# Altium PCB Membrane_Board.PcbDoc (part 1 of 5)
Units mm, origin at the board's own origin, x right, y up, seen from the top; angles counter-clockwise.
Board outline 303 x 126.06 mm, 2 copper layers (Top Layer, Bottom Layer), stack 1.499 mm thick; 248 components, 169 nets, 1258 pads, 728 vias.
Unrouted connection lines stored in the file: 317.
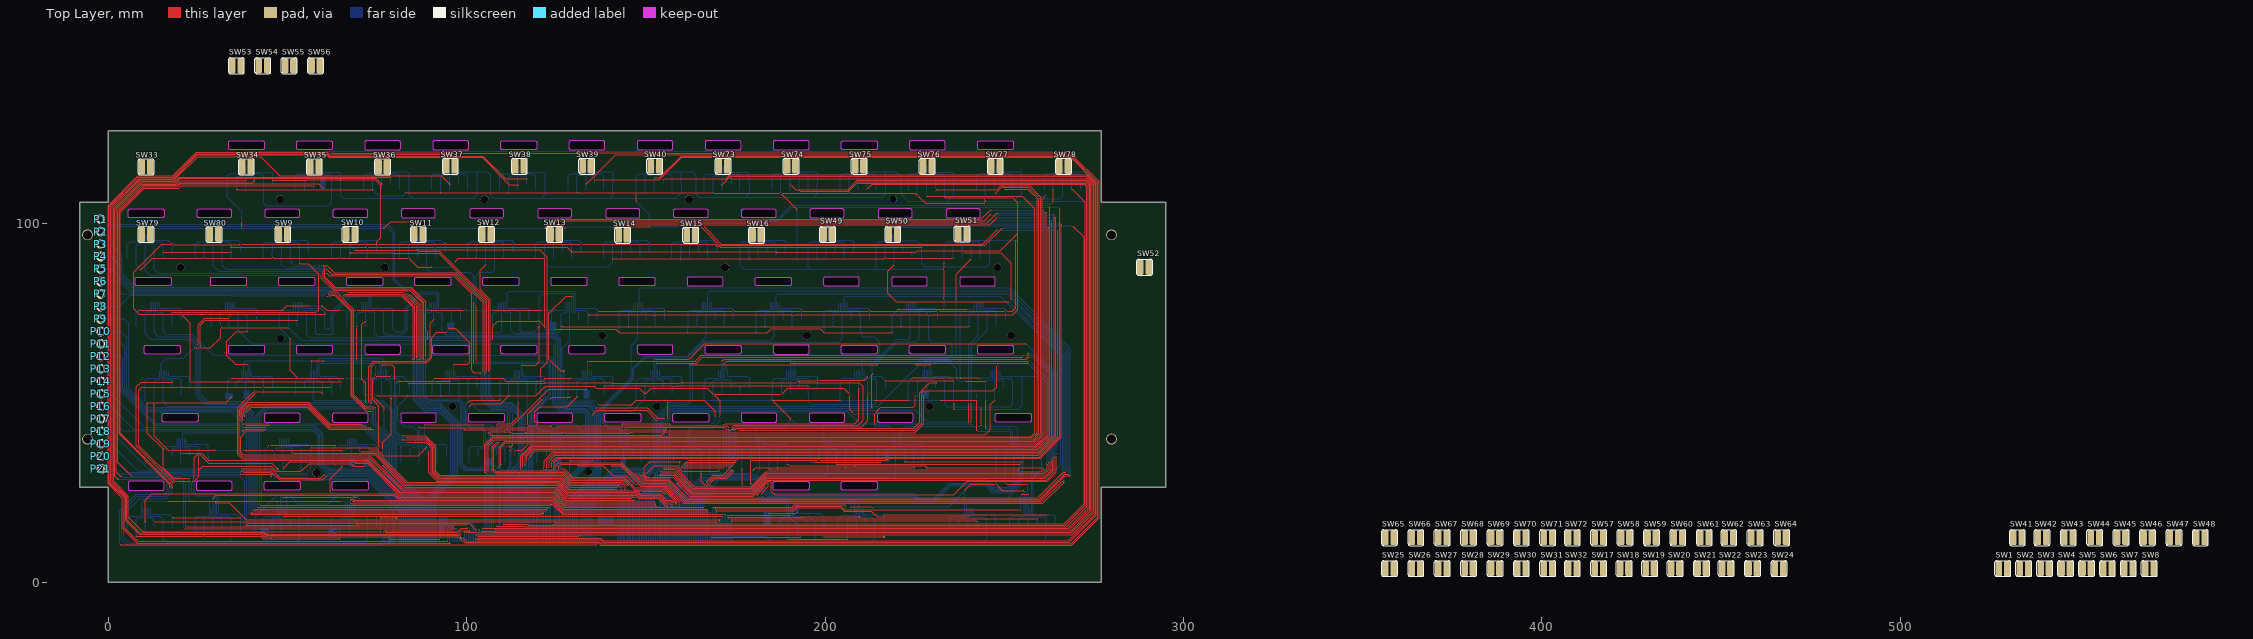
[diagram p0: Top Layer view]
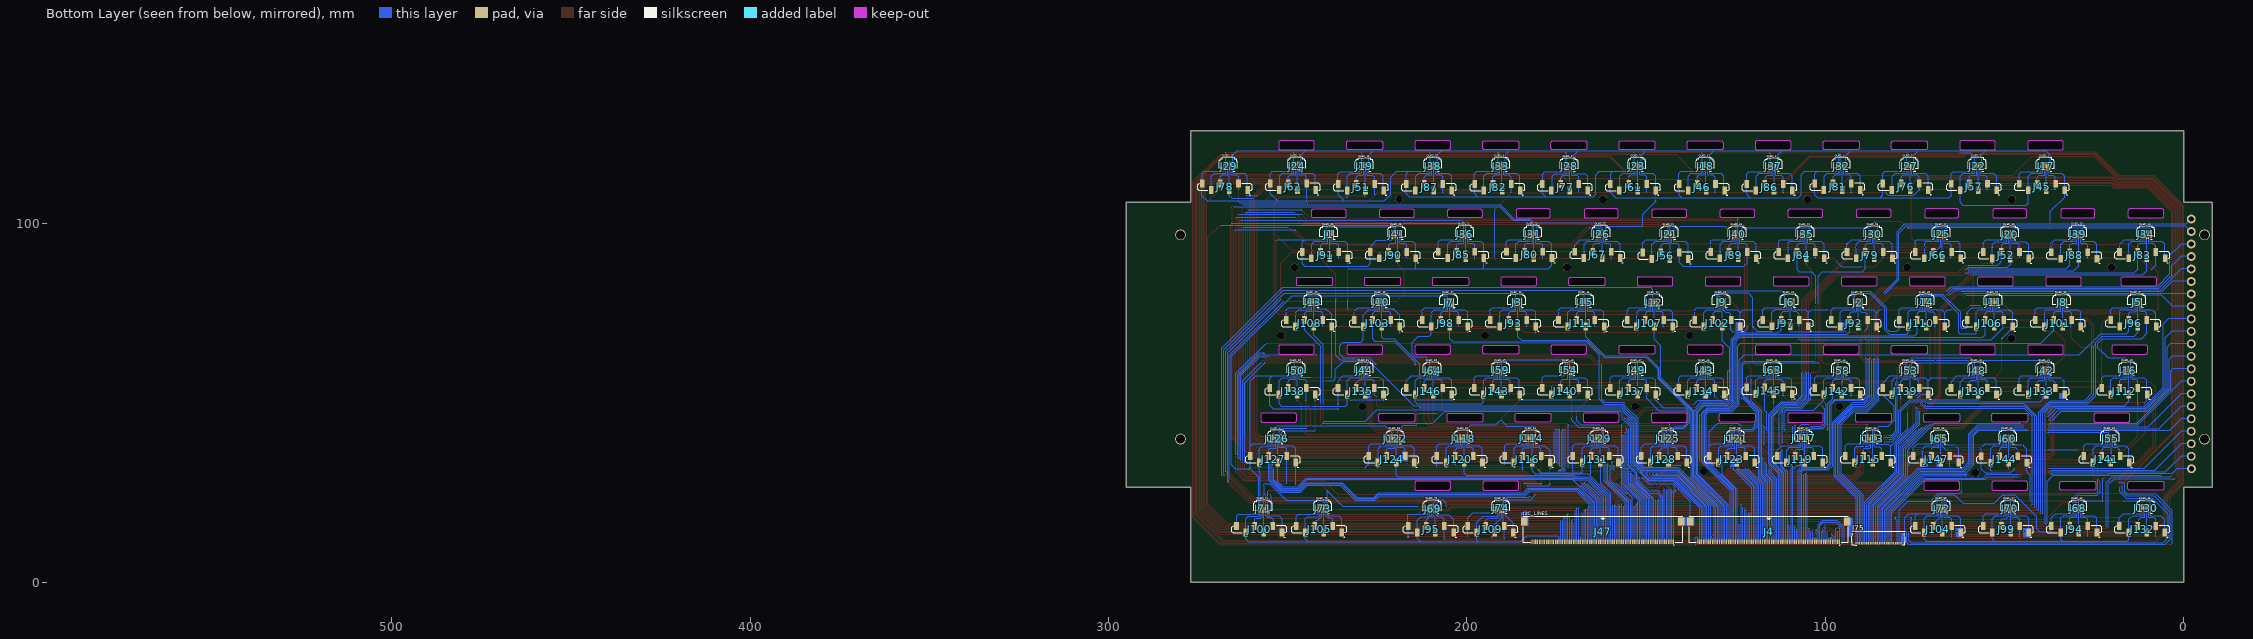
[diagram p1: Bottom Layer view, seen from below]

## Layer stack, top to bottom
Top Solder: solder mask 0.0508, Solder Resist, Dk 3.5
Top Layer: signal copper 0.3048
Dielectric 1: dielectric 0.889, FR-4, Dk 4.8
Bottom Layer: signal copper 0.3048
Bottom Solder: solder mask 0.0508, Solder Resist, Dk 3.5

## Board outline
0,0 0,26.495 -8,26.495 -8,106.055 0,106.055 0,126.055 277,126.055 277,106.055 295,106.055 295,26.495 277,26.495 277,0
cut-out: 6,101.68 cw(c6,102.18) 5.5,102.18 5.5,103.68 cw(c6,103.68) 6,104.18 15,104.18 cw(c15,103.68) 15.5,103.68 15.5,102.18 cw(c15,102.18) 15,101.68
cut-out: 24.75,102.18 24.75,103.68 cw(c25.25,103.68) 25.25,104.18 33.75,104.18 cw(c33.75,103.68) 34.25,103.68 34.25,102.18 cw(c33.75,102.18) 33.75,101.68 25.25,101.68 cw(c25.25,102.18)
cut-out: 7.5,83.18 7.5,84.68 cw(c8,84.68) 8,85.18 17,85.18 cw(c17,84.68) 17.5,84.68 17.5,83.18 cw(c17,83.18) 17,82.68 8,82.68 cw(c8,83.18)
cut-out: 28.5,83.18 28.5,84.68 cw(c29,84.68) 29,85.18 38,85.18 cw(c38,84.68) 38.5,84.68 38.5,83.18 cw(c38,83.18) 38,82.68 29,82.68 cw(c29,83.18)
cut-out: 33.5,64.18 33.5,65.68 cw(c34,65.68) 34,66.18 43,66.18 cw(c43,65.68) 43.5,65.68 43.5,64.18 cw(c43,64.18) 43,63.68 34,63.68 cw(c34,64.18)
cut-out: 10,64.18 10,65.68 cw(c10.5,65.68) 10.5,66.18 19.5,66.18 cw(c19.5,65.68) 20,65.68 20,64.18 cw(c19.5,64.18) 19.5,63.68 10.5,63.68 cw(c10.5,64.18)
cut-out: 15,45.18 15,46.68 cw(c15.5,46.68) 15.5,47.18 24.5,47.18 cw(c24.5,46.68) 25,46.68 25,45.18 cw(c24.5,45.18) 24.5,44.68 15.5,44.68 cw(c15.5,45.18)
cut-out: 5.5,26.18 ccw(c6,26.18) 6,25.68 15,25.68 ccw(c15,26.18) 15.5,26.18 15.5,27.68 ccw(c15,27.68) 15,28.18 6,28.18 ccw(c6,27.68) 5.5,27.68
cut-out: 24.5,26.18 ccw(c25,26.18) 25,25.68 34,25.68 ccw(c34,26.18) 34.5,26.18 34.5,27.68 ccw(c34,27.68) 34,28.18 25,28.18 ccw(c25,27.68) 24.5,27.68
cut-out: 43.5,26.18 43.5,27.68 cw(c44,27.68) 44,28.18 53,28.18 cw(c53,27.68) 53.5,27.68 53.5,26.18 cw(c53,26.18) 53,25.68 44,25.68 cw(c44,26.18)
cut-out: 62.5,26.18 62.5,27.68 cw(c63,27.68) 63,28.18 72,28.18 cw(c72,27.68) 72.5,27.68 72.5,26.18 cw(c72,26.18) 72,25.68 63,25.68 cw(c63,26.18)
cut-out: 100.75,102.18 ccw(c101.25,102.18) 101.25,101.68 109.75,101.68 ccw(c109.75,102.18) 110.25,102.18 110.25,103.68 ccw(c109.75,103.68) 109.75,104.18 101.25,104.18 ccw(c101.25,103.68) 100.75,103.68
cut-out: 81.75,102.18 ccw(c82.25,102.18) 82.25,101.68 90.75,101.68 ccw(c90.75,102.18) 91.25,102.18 91.25,103.68 ccw(c90.75,103.68) 90.75,104.18 82.25,104.18 ccw(c82.25,103.68) 81.75,103.68
cut-out: 62.75,102.18 62.75,103.68 cw(c63.25,103.68) 63.25,104.18 71.75,104.18 cw(c71.75,103.68) 72.25,103.68 72.25,102.18 cw(c71.75,102.18) 71.75,101.68 63.25,101.68 cw(c63.25,102.18)
cut-out: 43.75,102.18 43.75,103.68 cw(c44.25,103.68) 44.25,104.18 52.75,104.18 cw(c52.75,103.68) 53.25,103.68 53.25,102.18 cw(c52.75,102.18) 52.75,101.68 44.25,101.68 cw(c44.25,102.18)
cut-out: 47.5,83.18 47.5,84.68 cw(c48,84.68) 48,85.18 57,85.18 cw(c57,84.68) 57.5,84.68 57.5,83.18 cw(c57,83.18) 57,82.68 48,82.68 cw(c48,83.18)
cut-out: 66.5,83.18 66.5,84.68 cw(c67,84.68) 67,85.18 76,85.18 cw(c76,84.68) 76.5,84.68 76.5,83.18 cw(c76,83.18) 76,82.68 67,82.68 cw(c67,83.18)
cut-out: 52.5,64.18 52.5,65.68 cw(c53,65.68) 53,66.18 62,66.18 cw(c62,65.68) 62.5,65.68 62.5,64.18 cw(c62,64.18) 62,63.68 53,63.68 cw(c53,64.18)
cut-out: 43.5,45.18 ccw(c44,45.18) 44,44.68 53,44.68 ccw(c53,45.18) 53.5,45.18 53.5,46.68 ccw(c53,46.68) 53,47.18 44,47.18 ccw(c44,46.68) 43.5,46.68
cut-out: 62.5,45.18 ccw(c63,45.18) 63,44.68 72,44.68 ccw(c72,45.18) 72.5,45.18 72.5,46.68 ccw(c72,46.68) 72,47.18 63,47.18 ccw(c63,46.68) 62.5,46.68
cut-out: 71.5,64.18 ccw(c72,64.18) 72,63.68 81,63.68 ccw(c81,64.18) 81.5,64.18 81.5,65.68 ccw(c81,65.68) 81,66.18 72,66.18 ccw(c72,65.68) 71.5,65.68
cut-out: 81.5,45.18 ccw(c82,45.18) 82,44.68 91,44.68 ccw(c91,45.18) 91.5,45.18 91.5,46.68 ccw(c91,46.68) 91,47.18 82,47.18 ccw(c82,46.68) 81.5,46.68
cut-out: 100.5,45.18 100.5,46.68 cw(c101,46.68) 101,47.18 110,47.18 cw(c110,46.68) 110.5,46.68 110.5,45.18 cw(c110,45.18) 110,44.68 101,44.68 cw(c101,45.18)
cut-out: 90.5,64.18 90.5,65.68 cw(c91,65.68) 91,66.18 100,66.18 cw(c100,65.68) 100.5,65.68 100.5,64.18 cw(c100,64.18) 100,63.68 91,63.68 cw(c91,64.18)
cut-out: 85.5,83.18 85.5,84.68 cw(c86,84.68) 86,85.18 95,85.18 cw(c95,84.68) 95.5,84.68 95.5,83.18 cw(c95,83.18) 95,82.68 86,82.68 cw(c86,83.18)
cut-out: 104.5,83.18 104.5,84.68 cw(c105,84.68) 105,85.18 114,85.18 cw(c114,84.68) 114.5,84.68 114.5,83.18 cw(c114,83.18) 114,82.68 105,82.68 cw(c105,83.18)
cut-out: 109.5,64.18 109.5,65.68 cw(c110,65.68) 110,66.18 119,66.18 cw(c119,65.68) 119.5,65.68 119.5,64.18 cw(c119,64.18) 119,63.68 110,63.68 cw(c110,64.18)
cut-out: 119.75,102.18 ccw(c120.25,102.18) 120.25,101.68 128.75,101.68 ccw(c128.75,102.18) 129.25,102.18 129.25,103.68 ccw(c128.75,103.68) 128.75,104.18 120.25,104.18 ccw(c120.25,103.68) 119.75,103.68
cut-out: 138.75,102.18 ccw(c139.25,102.18) 139.25,101.68 147.75,101.68 ccw(c147.75,102.18) 148.25,102.18 148.25,103.68 ccw(c147.75,103.68) 147.75,104.18 139.25,104.18 ccw(c139.25,103.68) 138.75,103.68
cut-out: 123.5,83.18 123.5,84.68 cw(c124,84.68) 124,85.18 133,85.18 cw(c133,84.68) 133.5,84.68 133.5,83.18 cw(c133,83.18) 133,82.68 124,82.68 cw(c124,83.18)
cut-out: 142.5,83.18 142.5,84.68 cw(c143,84.68) 143,85.18 152,85.18 cw(c152,84.68) 152.5,84.68 152.5,83.18 cw(c152,83.18) 152,82.68 143,82.68 cw(c143,83.18)
cut-out: 128.5,64.18 128.5,65.68 cw(c129,65.68) 129,66.18 138,66.18 cw(c138,65.68) 138.5,65.68 138.5,64.18 cw(c138,64.18) 138,63.68 129,63.68 cw(c129,64.18)
cut-out: 147.5,64.18 ccw(c148,64.18) 148,63.68 157,63.68 ccw(c157,64.18) 157.5,64.18 157.5,65.68 ccw(c157,65.68) 157,66.18 148,66.18 ccw(c148,65.68) 147.5,65.68
cut-out: 119.5,45.18 ccw(c120,45.18) 120,44.68 129,44.68 ccw(c129,45.18) 129.5,45.18 129.5,46.68 ccw(c129,46.68) 129,47.18 120,47.18 ccw(c120,46.68) 119.5,46.68
cut-out: 138.5,45.18 138.5,46.68 cw(c139,46.68) 139,47.18 148,47.18 cw(c148,46.68) 148.5,46.68 148.5,45.18 cw(c148,45.18) 148,44.68 139,44.68 cw(c139,45.18)
cut-out: 157.5,45.18 157.5,46.68 cw(c158,46.68) 158,47.18 167,47.18 cw(c167,46.68) 167.5,46.68 167.5,45.18 cw(c167,45.18) 167,44.68 158,44.68 cw(c158,45.18)
cut-out: 157.75,102.18 157.75,103.68 cw(c158.25,103.68) 158.25,104.18 166.75,104.18 cw(c166.75,103.68) 167.25,103.68 167.25,102.18 cw(c166.75,102.18) 166.75,101.68 158.25,101.68 cw(c158.25,102.18)
cut-out: 176.75,102.18 176.75,103.68 cw(c177.25,103.68) 177.25,104.18 185.75,104.18 cw(c185.75,103.68) 186.25,103.68 186.25,102.18 cw(c185.75,102.18) 185.75,101.68 177.25,101.68 cw(c177.25,102.18)
cut-out: 180.5,83.18 180.5,84.68 cw(c181,84.68) 181,85.18 190,85.18 cw(c190,84.68) 190.5,84.68 190.5,83.18 cw(c190,83.18) 190,82.68 181,82.68 cw(c181,83.18)
cut-out: 161.5,83.18 ccw(c162,83.18) 162,82.68 171,82.68 ccw(c171,83.18) 171.5,83.18 171.5,84.68 ccw(c171,84.68) 171,85.18 162,85.18 ccw(c162,84.68) 161.5,84.68
cut-out: 166.5,64.18 166.5,65.68 cw(c167,65.68) 167,66.18 176,66.18 cw(c176,65.68) 176.5,65.68 176.5,64.18 cw(c176,64.18) 176,63.68 167,63.68 cw(c167,64.18)
cut-out: 185.5,64.18 ccw(c186,64.18) 186,63.68 195,63.68 ccw(c195,64.18) 195.5,64.18 195.5,65.68 ccw(c195,65.68) 195,66.18 186,66.18 ccw(c186,65.68) 185.5,65.68
cut-out: 204.5,64.18 204.5,65.68 cw(c205,65.68) 205,66.18 214,66.18 cw(c214,65.68) 214.5,65.68 214.5,64.18 cw(c214,64.18) 214,63.68 205,63.68 cw(c205,64.18)
cut-out: 199.5,83.18 ccw(c200,83.18) 200,82.68 209,82.68 ccw(c209,83.18) 209.5,83.18 209.5,84.68 ccw(c209,84.68) 209,85.18 200,85.18 ccw(c200,84.68) 199.5,84.68
cut-out: 195.75,102.18 ccw(c196.25,102.18) 196.25,101.68 204.75,101.68 ccw(c204.75,102.18) 205.25,102.18 205.25,103.68 ccw(c204.75,103.68) 204.75,104.18 196.25,104.18 ccw(c196.25,103.68) 195.75,103.68
cut-out: 176.5,45.18 ccw(c177,45.18) 177,44.68 186,44.68 ccw(c186,45.18) 186.5,45.18 186.5,46.68 ccw(c186,46.68) 186,47.18 177,47.18 ccw(c177,46.68) 176.5,46.68
cut-out: 195.5,45.18 ccw(c196,45.18) 196,44.68 205,44.68 ccw(c205,45.18) 205.5,45.18 205.5,46.68 ccw(c205,46.68) 205,47.18 196,47.18 ccw(c196,46.68) 195.5,46.68
cut-out: 185.5,26.18 185.5,27.68 cw(c186,27.68) 186,28.18 195,28.18 cw(c195,27.68) 195.5,27.68 195.5,26.18 cw(c195,26.18) 195,25.68 186,25.68 cw(c186,26.18)
cut-out: 204.5,26.18 204.5,27.68 cw(c205,27.68) 205,28.18 214,28.18 cw(c214,27.68) 214.5,27.68 214.5,26.18 cw(c214,26.18) 214,25.68 205,25.68 cw(c205,26.18)
cut-out: 214.5,45.18 ccw(c215,45.18) 215,44.68 224,44.68 ccw(c224,45.18) 224.5,45.18 224.5,46.68 ccw(c224,46.68) 224,47.18 215,47.18 ccw(c215,46.68) 214.5,46.68
cut-out: 247.5,45.18 247.5,46.68 cw(c248,46.68) 248,47.18 257,47.18 cw(c257,46.68) 257.5,46.68 257.5,45.18 cw(c257,45.18) 257,44.68 248,44.68 cw(c248,45.18)
cut-out: 223.5,64.18 223.5,65.68 cw(c224,65.68) 224,66.18 233,66.18 cw(c233,65.68) 233.5,65.68 233.5,64.18 cw(c233,64.18) 233,63.68 224,63.68 cw(c224,64.18)
cut-out: 242.5,64.18 242.5,65.68 cw(c243,65.68) 243,66.18 252,66.18 cw(c252,65.68) 252.5,65.68 252.5,64.18 cw(c252,64.18) 252,63.68 243,63.68 cw(c243,64.18)
cut-out: 218.5,83.18 ccw(c219,83.18) 219,82.68 228,82.68 ccw(c228,83.18) 228.5,83.18 228.5,84.68 ccw(c228,84.68) 228,85.18 219,85.18 ccw(c219,84.68) 218.5,84.68
cut-out: 214.75,102.18 ccw(c215.25,102.18) 215.25,101.68 223.75,101.68 ccw(c223.75,102.18) 224.25,102.18 224.25,103.68 ccw(c223.75,103.68) 223.75,104.18 215.25,104.18 ccw(c215.25,103.68) 214.75,103.68
cut-out: 237.5,83.18 ccw(c238,83.18) 238,82.68 247,82.68 ccw(c247,83.18) 247.5,83.18 247.5,84.68 ccw(c247,84.68) 247,85.18 238,85.18 ccw(c238,84.68) 237.5,84.68
cut-out: 233.75,102.18 ccw(c234.25,102.18) 234.25,101.68 242.75,101.68 ccw(c242.75,102.18) 243.25,102.18 243.25,103.68 ccw(c242.75,103.68) 242.75,104.18 234.25,104.18 ccw(c234.25,103.68) 233.75,103.68
cut-out: 242.5,121.18 242.5,122.68 cw(c243,122.68) 243,123.18 252,123.18 cw(c252,122.68) 252.5,122.68 252.5,121.18 cw(c252,121.18) 252,120.68 243,120.68 cw(c243,121.18)
cut-out: 223.5,121.18 ccw(c224,121.18) 224,120.68 233,120.68 ccw(c233,121.18) 233.5,121.18 233.5,122.68 ccw(c233,122.68) 233,123.18 224,123.18 ccw(c224,122.68) 223.5,122.68
cut-out: 204.5,121.18 204.5,122.68 cw(c205,122.68) 205,123.18 214,123.18 cw(c214,122.68) 214.5,122.68 214.5,121.18 cw(c214,121.18) 214,120.68 205,120.68 cw(c205,121.18)
cut-out: 185.5,121.18 ccw(c186,121.18) 186,120.68 195,120.68 ccw(c195,121.18) 195.5,121.18 195.5,122.68 ccw(c195,122.68) 195,123.18 186,123.18 ccw(c186,122.68) 185.5,122.68
cut-out: 166.5,121.18 ccw(c167,121.18) 167,120.68 176,120.68 ccw(c176,121.18) 176.5,121.18 176.5,122.68 ccw(c176,122.68) 176,123.18 167,123.18 ccw(c167,122.68) 166.5,122.68
cut-out: 148,120.68 157,120.68 ccw(c157,121.18) 157.5,121.18 157.5,122.68 ccw(c157,122.68) 157,123.18 148,123.18 ccw(c148,122.68) 147.5,122.68 147.5,121.18 ccw(c148,121.18)
cut-out: 148,120.68 157,120.68 ccw(c157,121.18) 157.5,121.18 157.5,122.68 ccw(c157,122.68) 157,123.18 148,123.18 ccw(c148,122.68) 147.5,122.68 147.5,121.18 ccw(c148,121.18)
cut-out: 129,120.68 138,120.68 ccw(c138,121.18) 138.5,121.18 138.5,122.68 ccw(c138,122.68) 138,123.18 129,123.18 ccw(c129,122.68) 128.5,122.68 128.5,121.18 ccw(c129,121.18)
cut-out: 109.5,121.18 109.5,122.68 cw(c110,122.68) 110,123.18 119,123.18 cw(c119,122.68) 119.5,122.68 119.5,121.18 cw(c119,121.18) 119,120.68 110,120.68 cw(c110,121.18)
cut-out: 91,120.68 100,120.68 ccw(c100,121.18) 100.5,121.18 100.5,122.68 ccw(c100,122.68) 100,123.18 91,123.18 ccw(c91,122.68) 90.5,122.68 90.5,121.18 ccw(c91,121.18)
cut-out: 72,120.68 81,120.68 ccw(c81,121.18) 81.5,121.18 81.5,122.68 ccw(c81,122.68) 81,123.18 72,123.18 ccw(c72,122.68) 71.5,122.68 71.5,121.18 ccw(c72,121.18)
cut-out: 52.5,121.18 52.5,122.68 cw(c53,122.68) 53,123.18 62,123.18 cw(c62,122.68) 62.5,122.68 62.5,121.18 cw(c62,121.18) 62,120.68 53,120.68 cw(c53,121.18)
cut-out: 34,120.68 cw(c34,121.18) 33.5,121.18 33.5,122.68 cw(c34,122.68) 34,123.18 43,123.18 cw(c43,122.68) 43.5,122.68 43.5,121.18 cw(c43,121.18) 43,120.68

## Design rules (kind name [scope] priority, off if disabled: settings)
Clearance [All] p1: gap=0.178 ignorepadtopadclearanceinfootprint=FALSE except(0.102: Arc-SMDPad Track-SMDPad SMDPad-SMDPad)
ComponentClearance [All] p1: gap=0 collisioncheckmode=3 verticalgap=0 showdistances=FALSE
HoleSize [All] p1: absolutevalues=TRUE maxlimit=25.4 minlimit=0.025 maxpercent=80.000 minpercent=20.000
HoleToHoleClearance [All] p1: gap=0 allowstackedmicrovias=TRUE
MinimumSolderMaskSliver [All] p1: minsoldermaskwidth=0
PolygonConnect [All] p1: connectstyle=Relief reliefconductorwidth=0.254 reliefentries=4 polygonreliefangle="90 Angle" airgapwidth=0.254
RoutingVias [All] p1: holewidth=0.3 width=0.6 viastyle="Through Hole" minholewidth=0.2 minwidth=0.4 maxholewidth=0.3 maxwidth=0.6
SilkToSilkClearance [All] p1: silktosilkclearance=0
SilkToSolderMaskClearance [IsPad] p1: minsilkscreentomaskgap=0 clearancetoexposedcopper=TRUE
SolderMaskExpansion [All] p1: expansion=0.102 istentingtop=FALSE
Width [All] p1: maxlimit=1.27 minlimit=0.203 preferedwidth=0.203 minimp=50.000000 maximp=50.000000 favimp=50.000000
24 further rules are at their usual default settings.

## Classes and differential pairs
component class U_Button_Sheet_2: SW41 SW42 SW43 SW44 SW45 SW46 SW47 SW48 SW49 SW50 SW51 SW52 SW53 SW54 SW55 SW56 SW57 SW58 SW59 SW60 SW61 SW62 SW63 SW64 SW65 SW66 SW67 SW68 SW69 SW70 SW71 SW72 SW73 SW74 SW75 SW76 SW77 SW78 SW79 SW80
component class U_Button_Sheet_1: SW1 SW2 SW3 SW4 SW5 SW6 SW7 SW8 SW9 SW10 SW11 SW12 SW13 SW14 SW15 SW16 SW17 SW18 SW19 SW20 SW21 SW22 SW23 SW24 SW25 SW26 SW27 SW28 SW29 SW30 SW31 SW32 SW33 SW34 SW35 SW36 SW37 SW38 SW39 SW40
component class U_Header_Sheet_4: J133 J134 J135 J136 J137 J138 J139 J140 J141 J142 J143 J144 J145 J146 J147
component class U_Header_Sheet_3: J113 J114 J115 J116 J117 J118 J119 J120 J121 J122 J123 J124 J125 J126 J127 J128 J129 J130 J131 J132 S
component class U_Header_Sheet_2: J91 J92 J93 J94 J95 J96 J97 J98 J99 J100 J101 J102 J103 J104 J105 J106 J107 J108 J109 J110 J111 J112
component class U_Header_Sheet_1: J45 J46 J51 J52 J56 J57 J61 J62 J66 J67 J76 J77 J78 J79 J80 J81 J82 J83 J84 J85 J86 J87 J88 J89 J90
component class U_Controller_Sheet_5: J75 P1 P2 P3 P4 P5 P6 P7 P8 P9 P10 P11 P12 P13 P14 P15 P16 P17 P18 P19 P20 P21
component class U_Connector_Sheet_4: J68 J69 J70 J71 J72 J73 J74
component class U_Connector_Sheet_3: J42 J43 J44 J47 J48 J49 J50 J53 J54 J55 J58 J59 J60 J63 J64 J65
component class U_Connector_Sheet_2: J17 J18 J19 J20 J21 J22 J23 J24 J25 J26 J27 J28 J29 J30 J31 J32 J33 J34 J35 J36 J37 J38 J39 J40 J41
component class U_Connector_Sheet_1: J1 J2 J3 J4 J5 J6 J7 J8 J9 J10 J11 J12 J13 J14 J15 J16

## Components (designator, comment, footprint, x,y, rotation, side; value= is the part's Value field where it differs from the comment)
J1 "FH19C-6S-0.5SH(10)" FH19C-6S-0.5SH(10) 237.28,97.072 r0 bottom locked
J2 "FH19C-6S-0.5SH(10)" FH19C-6S-0.5SH(10) 89.706,78.048 r0 bottom locked
J3 "FH19C-6S-0.5SH(10)" FH19C-6S-0.5SH(10) 184.78,78.073 r0 bottom locked
J4 "046288080000846+" 046288080000846+ 115.731,14.14 r0 bottom locked
J5 "FH19C-6S-0.5SH(10)" FH19C-6S-0.5SH(10) 11.744,78.073 r0 bottom locked
J6 "FH19C-6S-0.5SH(10)" FH19C-6S-0.5SH(10) 108.756,78.099 r0 bottom locked
J7 "FH19C-6S-0.5SH(10)" FH19C-6S-0.5SH(10) 203.779,78.048 r0 bottom locked
J8 "FH19C-6S-0.5SH(10)" FH19C-6S-0.5SH(10) 32.726,78.073 r0 bottom locked
J9 "FH19C-6S-0.5SH(10)" FH19C-6S-0.5SH(10) 127.773,78.073 r0 bottom locked
J10 "FH19C-6S-0.5SH(10)" FH19C-6S-0.5SH(10) 222.761,78.073 r0 bottom locked
J11 "FH19C-6S-0.5SH(10)" FH19C-6S-0.5SH(10) 51.766,78.073 r0 bottom locked
J12 "FH19C-6S-0.5SH(10)" FH19C-6S-0.5SH(10) 146.619,77.997 r0 bottom locked
J13 "FH19C-6S-0.5SH(10)" FH19C-6S-0.5SH(10) 241.742,78.073 r0 bottom locked
J14 "FH19C-6S-0.5SH(10)" FH19C-6S-0.5SH(10) 70.758,78.073 r0 bottom locked
J15 "FH19C-6S-0.5SH(10)" FH19C-6S-0.5SH(10) 165.779,78.073 r0 bottom locked
J16 "FH19C-6S-0.5SH(10)" FH19C-6S-0.5SH(10) 14.251,59.074 r0 bottom locked
J17 "FH19C-6S-0.5SH(10)" FH19C-6S-0.5SH(10) 37.256,116.072 r0 bottom locked
J18 "FH19C-6S-0.5SH(10)" FH19C-6S-0.5SH(10) 132.251,116.122 r0 bottom locked
J19 "FH19C-6S-0.5SH(10)" FH19C-6S-0.5SH(10) 227.315,116.046 r0 bottom locked
J20 "FH19C-6S-0.5SH(10)" FH19C-6S-0.5SH(10) 47.271,97.022 r0 bottom locked
J21 "FH19C-6S-0.5SH(10)" FH19C-6S-0.5SH(10) 142.241,97.072 r0 bottom locked
J22 "FH19C-6S-0.5SH(10)" FH19C-6S-0.5SH(10) 56.245,116.072 r0 bottom locked
J23 "FH19C-6S-0.5SH(10)" FH19C-6S-0.5SH(10) 151.268,116.097 r0 bottom locked
J24 "FH19C-6S-0.5SH(10)" FH19C-6S-0.5SH(10) 246.23,116.148 r0 bottom locked
J25 "FH19C-6S-0.5SH(10)" FH19C-6S-0.5SH(10) 66.27,97.072 r0 bottom locked
J26 "FH19C-6S-0.5SH(10)" FH19C-6S-0.5SH(10) 161.258,97.098 r0 bottom locked
J27 "FH19C-6S-0.5SH(10)" FH19C-6S-0.5SH(10) 75.28,116.097 r0 bottom locked
J28 "FH19C-6S-0.5SH(10)" FH19C-6S-0.5SH(10) 170.2,116.021 r0 bottom locked
J29 "FH19C-6S-0.5SH(10)" FH19C-6S-0.5SH(10) 265.237,116.122 r0 bottom locked
J30 "FH19C-6S-0.5SH(10)" FH19C-6S-0.5SH(10) 85.286,97.072 r0 bottom locked
J31 "FH19C-6S-0.5SH(10)" FH19C-6S-0.5SH(10) 180.3,97.098 r0 bottom locked
J32 "FH19C-6S-0.5SH(10)" FH19C-6S-0.5SH(10) 94.254,116.122 r0 bottom locked
J33 "FH19C-6S-0.5SH(10)" FH19C-6S-0.5SH(10) 189.25,116.122 r0 bottom locked
J34 "FH19C-6S-0.5SH(10)" FH19C-6S-0.5SH(10) 9.239,97.072 r0 bottom locked
J35 "FH19C-6S-0.5SH(10)" FH19C-6S-0.5SH(10) 104.311,97.072 r0 bottom locked
J36 "FH19C-6S-0.5SH(10)" FH19C-6S-0.5SH(10) 199.282,97.098 r0 bottom locked
J37 "FH19C-6S-0.5SH(10)" FH19C-6S-0.5SH(10) 113.253,116.046 r0 bottom locked
J38 "FH19C-6S-0.5SH(10)" FH19C-6S-0.5SH(10) 208.205,116.122 r0 bottom locked
J39 "FH19C-6S-0.5SH(10)" FH19C-6S-0.5SH(10) 28.229,97.098 r0 bottom locked
J40 "FH19C-6S-0.5SH(10)" FH19C-6S-0.5SH(10) 123.294,97.072 r0 bottom locked
J41 "FH19C-6S-0.5SH(10)" FH19C-6S-0.5SH(10) 218.306,97.072 r0 bottom locked
J42 "FH19C-6S-0.5SH(10)" FH19C-6S-0.5SH(10) 37.28,59.074 r0 bottom locked
J43 "FH19C-6S-0.5SH(10)" FH19C-6S-0.5SH(10) 132.284,59.074 r0 bottom locked
J44 "FH19C-6S-0.5SH(10)" FH19C-6S-0.5SH(10) 227.314,59.099 r0 bottom locked
J45 "X6511WVS-06H-C60D48R2" X6511WVS-06H-C60D48R2 33.176,109.407 r0 bottom locked
J46 "X6511WVS-06H-C60D48R2" X6511WVS-06H-C60D48R2 128.061,109.366 r0 bottom locked
J47 "046288080000846+" 046288080000846+ 162.01,14.14 r0 bottom locked
J48 "FH19C-6S-0.5SH(10)" FH19C-6S-0.5SH(10) 56.262,59.074 r0 bottom locked
J49 "FH19C-6S-0.5SH(10)" FH19C-6S-0.5SH(10) 151.318,59.099 r0 bottom locked
J50 "FH19C-6S-0.5SH(10)" FH19C-6S-0.5SH(10) 246.314,59.074 r0 bottom locked
J51 "X6511WVS-06H-C60D48R2" X6511WVS-06H-C60D48R2 223.184,109.366 r0 bottom locked
J52 "X6511WVS-06H-C60D48R2" X6511WVS-06H-C60D48R2 43.225,90.367 r0 bottom locked
J53 "FH19C-6S-0.5SH(10)" FH19C-6S-0.5SH(10) 75.322,59.049 r0 bottom locked
J54 "FH19C-6S-0.5SH(10)" FH19C-6S-0.5SH(10) 170.316,59.099 r0 bottom locked
J55 "FH19C-6S-0.5SH(10)" FH19C-6S-0.5SH(10) 19.246,40.049 r0 bottom locked
J56 "X6511WVS-06H-C60D48R2" X6511WVS-06H-C60D48R2 138.221,90.232 r0 bottom locked
J57 "X6511WVS-06H-C60D48R2" X6511WVS-06H-C60D48R2 52.165,109.407 r0 bottom locked
J58 "FH19C-6S-0.5SH(10)" FH19C-6S-0.5SH(10) 94.321,59.074 r0 bottom locked
J59 "FH19C-6S-0.5SH(10)" FH19C-6S-0.5SH(10) 189.315,59.099 r0 bottom locked
J60 "FH19C-6S-0.5SH(10)" FH19C-6S-0.5SH(10) 47.788,40.049 r0 bottom locked
J61 "X6511WVS-06H-C60D48R2" X6511WVS-06H-C60D48R2 147.238,109.366 r0 bottom locked
J62 "X6511WVS-06H-C60D48R2" X6511WVS-06H-C60D48R2 242.15,109.484 r0 bottom locked
J63 "FH19C-6S-0.5SH(10)" FH19C-6S-0.5SH(10) 113.303,59.099 r0 bottom locked
J64 "FH19C-6S-0.5SH(10)" FH19C-6S-0.5SH(10) 208.307,59.074 r0 bottom locked
J65 "FH19C-6S-0.5SH(10)" FH19C-6S-0.5SH(10) 66.786,40.075 r0 bottom locked
J66 "X6511WVS-06H-C60D48R2" X6511WVS-06H-C60D48R2 62.19,90.408 r0 bottom locked
J67 "X6511WVS-06H-C60D48R2" X6511WVS-06H-C60D48R2 157.178,90.434 r0 bottom locked
J68 "FH19C-6S-0.5SH(10)" FH19C-6S-0.5SH(10) 28.229,20.593 r0 bottom locked
J69 "FH19C-6S-0.5SH(10)" FH19C-6S-0.5SH(10) 208.307,20.568 r0 bottom locked
J70 "FH19C-6S-0.5SH(10)" FH19C-6S-0.5SH(10) 47.255,20.568 r0 bottom locked
J71 "FH19C-6S-0.5SH(10)" FH19C-6S-0.5SH(10) 255.595,20.568 r0 bottom locked
J72 "FH19C-6S-0.5SH(10)" FH19C-6S-0.5SH(10) 66.27,20.568 r0 bottom locked
J73 "FH19C-6S-0.5SH(10)" FH19C-6S-0.5SH(10) 238.923,20.568 r0 bottom locked
J74 "FH19C-6S-0.5SH(10)" FH19C-6S-0.5SH(10) 189.258,20.593 r0 bottom locked
J75 "FH34SRJ-26S-0.5SH(50)" FH34SRJ-26S-0.5SH(50) 85.139,12.158 r0 bottom locked
J76 "X6511WVS-06H-C60D48R2" X6511WVS-06H-C60D48R2 71.2,109.511 r0 bottom locked
J77 "X6511WVS-06H-C60D48R2" X6511WVS-06H-C60D48R2 166.212,109.366 r0 bottom locked
J78 "X6511WVS-06H-C60D48R2" X6511WVS-06H-C60D48R2 261.157,109.458 r0 bottom locked
J79 "X6511WVS-06H-C60D48R2" X6511WVS-06H-C60D48R2 81.206,90.408 r0 bottom locked
J80 "X6511WVS-06H-C60D48R2" X6511WVS-06H-C60D48R2 176.22,90.434 r0 bottom locked
J81 "X6511WVS-06H-C60D48R2" X6511WVS-06H-C60D48R2 90.189,109.511 r0 bottom locked
J82 "X6511WVS-06H-C60D48R2" X6511WVS-06H-C60D48R2 185.059,109.366 r0 bottom locked
J83 "X6511WVS-06H-C60D48R2" X6511WVS-06H-C60D48R2 5.159,90.408 r0 bottom locked
J84 "X6511WVS-06H-C60D48R2" X6511WVS-06H-C60D48R2 100.231,90.408 r0 bottom locked
J85 "X6511WVS-06H-C60D48R2" X6511WVS-06H-C60D48R2 195.202,90.434 r0 bottom locked
J86 "X6511WVS-06H-C60D48R2" X6511WVS-06H-C60D48R2 109.189,109.366 r0 bottom locked
J87 "X6511WVS-06H-C60D48R2" X6511WVS-06H-C60D48R2 204.185,109.366 r0 bottom locked
J88 "X6511WVS-06H-C60D48R2" X6511WVS-06H-C60D48R2 24.15,90.291 r0 bottom locked
J89 "X6511WVS-06H-C60D48R2" X6511WVS-06H-C60D48R2 119.214,90.408 r0 bottom locked
J90 "X6511WVS-06H-C60D48R2" X6511WVS-06H-C60D48R2 214.226,90.408 r0 bottom locked
J91 "X6511WVS-06H-C60D48R2" X6511WVS-06H-C60D48R2 233.2,90.408 r0 bottom locked
J92 "X6511WVS-06H-C60D48R2" X6511WVS-06H-C60D48R2 85.626,71.384 r0 bottom locked
J93 "X6511WVS-06H-C60D48R2" X6511WVS-06H-C60D48R2 180.7,71.409 r0 bottom locked
J94 "X6511WVS-06H-C60D48R2" X6511WVS-06H-C60D48R2 24.149,13.929 r0 bottom locked
J95 "X6511WVS-06H-C60D48R2" X6511WVS-06H-C60D48R2 203.693,13.929 r0 bottom locked
J96 "X6511WVS-06H-C60D48R2" X6511WVS-06H-C60D48R2 7.664,71.409 r0 bottom locked
J97 "X6511WVS-06H-C60D48R2" X6511WVS-06H-C60D48R2 104.676,71.434 r0 bottom locked
J98 "X6511WVS-06H-C60D48R2" X6511WVS-06H-C60D48R2 199.699,71.384 r0 bottom locked
J99 "X6511WVS-06H-C60D48R2" X6511WVS-06H-C60D48R2 43.175,13.903 r0 bottom locked
J100 "X6511WVS-06H-C60D48R2" X6511WVS-06H-C60D48R2 251.556,13.929 r0 bottom locked
J101 "X6511WVS-06H-C60D48R2" X6511WVS-06H-C60D48R2 28.646,71.409 r0 bottom locked
J102 "X6511WVS-06H-C60D48R2" X6511WVS-06H-C60D48R2 123.693,71.409 r0 bottom locked
J103 "X6511WVS-06H-C60D48R2" X6511WVS-06H-C60D48R2 218.681,71.409 r0 bottom locked
J104 "X6511WVS-06H-C60D48R2" X6511WVS-06H-C60D48R2 62.19,13.903 r0 bottom locked
J105 "X6511WVS-06H-C60D48R2" X6511WVS-06H-C60D48R2 234.843,13.929 r0 bottom locked
J106 "X6511WVS-06H-C60D48R2" X6511WVS-06H-C60D48R2 47.686,71.409 r0 bottom locked
J107 "X6511WVS-06H-C60D48R2" X6511WVS-06H-C60D48R2 142.539,71.333 r0 bottom locked
J108 "X6511WVS-06H-C60D48R2" X6511WVS-06H-C60D48R2 237.662,71.409 r0 bottom locked
J109 "X6511WVS-06H-C60D48R2" X6511WVS-06H-C60D48R2 187.058,13.929 r0 bottom locked
J110 "X6511WVS-06H-C60D48R2" X6511WVS-06H-C60D48R2 66.678,71.409 r0 bottom locked
J111 "X6511WVS-06H-C60D48R2" X6511WVS-06H-C60D48R2 161.699,71.409 r0 bottom locked
J112 "X6511WVS-06H-C60D48R2" X6511WVS-06H-C60D48R2 10.171,52.41 r0 bottom locked
J113 "FH19C-6S-0.5SH(10)" FH19C-6S-0.5SH(10) 85.744,40.1 r0 bottom locked
J114 "FH19C-6S-0.5SH(10)" FH19C-6S-0.5SH(10) 180.79,40.126 r0 bottom locked
J115 "X6511WVS-06H-C60D48R2" X6511WVS-06H-C60D48R2 81.664,33.436 r0 bottom locked
J116 "X6511WVS-06H-C60D48R2" X6511WVS-06H-C60D48R2 176.71,33.461 r0 bottom locked
J117 "FH19C-6S-0.5SH(10)" FH19C-6S-0.5SH(10) 104.743,40.126 r0 bottom locked
J118 "FH19C-6S-0.5SH(10)" FH19C-6S-0.5SH(10) 199.697,40.1 r0 bottom locked
J119 "X6511WVS-06H-C60D48R2" X6511WVS-06H-C60D48R2 100.663,33.461 r0 bottom locked
J120 "X6511WVS-06H-C60D48R2" X6511WVS-06H-C60D48R2 195.617,33.436 r0 bottom locked
J121 "FH19C-6S-0.5SH(10)" FH19C-6S-0.5SH(10) 123.725,40.1 r0 bottom locked
J122 "FH19C-6S-0.5SH(10)" FH19C-6S-0.5SH(10) 218.73,40.075 r0 bottom locked
J123 "X6511WVS-06H-C60D48R2" X6511WVS-06H-C60D48R2 119.645,33.436 r0 bottom locked
J124 "X6511WVS-06H-C60D48R2" X6511WVS-06H-C60D48R2 214.65,33.411 r0 bottom locked
J125 "FH19C-6S-0.5SH(10)" FH19C-6S-0.5SH(10) 142.716,40.1 r0 bottom locked
J126 "FH19C-6S-0.5SH(10)" FH19C-6S-0.5SH(10) 251.774,40.075 r0 bottom locked
J127 "X6511WVS-06H-C60D48R2" X6511WVS-06H-C60D48R2 247.694,33.411 r0 bottom locked
J128 "X6511WVS-06H-C60D48R2" X6511WVS-06H-C60D48R2 138.636,33.436 r0 bottom locked
J129 "FH19C-6S-0.5SH(10)" FH19C-6S-0.5SH(10) 161.748,40.1 r0 bottom locked
J130 "FH19C-6S-0.5SH(10)" FH19C-6S-0.5SH(10) 9.256,20.593 r0 bottom locked
J131 "X6511WVS-06H-C60D48R2" X6511WVS-06H-C60D48R2 157.668,33.436 r0 bottom locked
J132 "X6511WVS-06H-C60D48R2" X6511WVS-06H-C60D48R2 5.176,13.929 r0 bottom locked
J133 "X6511WVS-06H-C60D48R2" X6511WVS-06H-C60D48R2 33.2,52.41 r0 bottom locked
J134 "X6511WVS-06H-C60D48R2" X6511WVS-06H-C60D48R2 128.204,52.41 r0 bottom locked
J135 "X6511WVS-06H-C60D48R2" X6511WVS-06H-C60D48R2 223.234,52.435 r0 bottom locked
J136 "X6511WVS-06H-C60D48R2" X6511WVS-06H-C60D48R2 52.182,52.41 r0 bottom locked
J137 "X6511WVS-06H-C60D48R2" X6511WVS-06H-C60D48R2 147.238,52.435 r0 bottom locked
J138 "X6511WVS-06H-C60D48R2" X6511WVS-06H-C60D48R2 242.234,52.41 r0 bottom locked
J139 "X6511WVS-06H-C60D48R2" X6511WVS-06H-C60D48R2 71.242,52.384 r0 bottom locked
J140 "X6511WVS-06H-C60D48R2" X6511WVS-06H-C60D48R2 166.236,52.435 r0 bottom locked
J141 "X6511WVS-06H-C60D48R2" X6511WVS-06H-C60D48R2 15.166,33.385 r0 bottom locked
J142 "X6511WVS-06H-C60D48R2" X6511WVS-06H-C60D48R2 90.241,52.41 r0 bottom locked
J143 "X6511WVS-06H-C60D48R2" X6511WVS-06H-C60D48R2 185.235,52.435 r0 bottom locked
J144 "X6511WVS-06H-C60D48R2" X6511WVS-06H-C60D48R2 43.683,33.369 r0 bottom locked
J145 "X6511WVS-06H-C60D48R2" X6511WVS-06H-C60D48R2 109.215,52.564 r0 bottom locked
J146 "X6511WVS-06H-C60D48R2" X6511WVS-06H-C60D48R2 204.227,52.41 r0 bottom locked
J147 "X6511WVS-06H-C60D48R2" X6511WVS-06H-C60D48R2 62.706,33.411 r0 bottom locked
P1 "Test Point" "TEST POINT"#1 -2.153,101.358 r90 top locked
P2 "Test Point" "TEST POINT"#1 -2.153,97.874 r90 top locked
P3 "Test Point" "TEST POINT"#1 -2.153,94.39 r90 top locked
P4 "Test Point" "TEST POINT"#1 -2.153,90.907 r90 top locked
P5 "Test Point" "TEST POINT"#1 -2.153,87.423 r90 top locked
P6 "Test Point" "TEST POINT"#1 -2.153,83.94 r90 top locked
P7 "Test Point" "TEST POINT"#1 -2.153,80.456 r90 top locked
P8 "Test Point" "TEST POINT"#1 -2.153,76.972 r90 top locked
P9 "Test Point" "TEST POINT"#1 -2.153,73.489 r90 top locked
P10 "Test Point" "TEST POINT"#1 -2.153,70.005 r90 top locked
P11 "Test Point" "TEST POINT"#1 -2.153,66.522 r90 top locked
P12 "Test Point" "TEST POINT"#1 -2.153,63.038 r90 top locked
P13 "Test Point" "TEST POINT"#1 -2.153,59.554 r90 top locked
P14 "Test Point" "TEST POINT"#1 -2.153,56.071 r90 top locked
P15 "Test Point" "TEST POINT"#1 -2.153,52.587 r90 top locked
P16 "Test Point" "TEST POINT"#1 -2.153,49.103 r90 top locked
P17 "Test Point" "TEST POINT"#1 -2.153,45.62 r90 top locked
P18 "Test Point" "TEST POINT"#1 -2.153,42.136 r90 top locked
P19 "Test Point" "TEST POINT"#1 -2.153,38.653 r90 top locked
P20 "Test Point" "TEST POINT"#1 -2.153,35.169 r90 top locked
P21 "Test Point" "TEST POINT"#2 -1.783,31.685 r90 top locked
SW1 "Graphite Contact" "Graphite Contact" 527.451,3.829 r0 top
SW2 "Graphite Contact" "Graphite Contact" 533.293,3.829 r0 top
SW3 "Graphite Contact" "Graphite Contact" 539.135,3.829 r0 top
SW4 "Graphite Contact" "Graphite Contact" 544.977,3.829 r0 top
SW5 "Graphite Contact" "Graphite Contact" 550.819,3.829 r0 top
SW6 "Graphite Contact" "Graphite Contact" 556.636,3.829 r0 top
SW7 "Graphite Contact" "Graphite Contact" 562.478,3.829 r0 top
SW8 "Graphite Contact" "Graphite Contact" 568.32,3.829 r0 top
SW9 "Graphite Contact" "Graphite Contact" 47.536,97.079 r0 top
SW10 "Graphite Contact" "Graphite Contact" 66.319,97.079 r0 top
SW11 "Graphite Contact" "Graphite Contact" 85.331,97.079 r0 top
SW12 "Graphite Contact" "Graphite Contact" 104.33,97.079 r0 top
SW13 "Graphite Contact" "Graphite Contact" 123.329,97.079 r0 top
SW14 "Graphite Contact" "Graphite Contact" 142.342,96.85 r0 top
SW15 "Graphite Contact" "Graphite Contact" 161.341,96.85 r0 top
SW16 "Graphite Contact" "Graphite Contact" 179.692,96.85 r0 top
SW17 "Graphite Contact" "Graphite Contact" 414.7,3.829 r0 top
SW18 "Graphite Contact" "Graphite Contact" 421.812,3.829 r0 top
SW19 "Graphite Contact" "Graphite Contact" 428.924,3.829 r0 top
SW20 "Graphite Contact" "Graphite Contact" 436.036,3.829 r0 top
SW21 "Graphite Contact" "Graphite Contact" 443.402,3.829 r0 top
SW22 "Graphite Contact" "Graphite Contact" 450.26,3.829 r0 top
SW23 "Graphite Contact" "Graphite Contact" 457.626,3.829 r0 top
SW24 "Graphite Contact" "Graphite Contact" 464.992,3.829 r0 top
SW25 "Graphite Contact" "Graphite Contact" 356.306,3.829 r0 top
SW26 "Graphite Contact" "Graphite Contact" 363.672,3.829 r0 top
SW27 "Graphite Contact" "Graphite Contact" 371.038,3.829 r0 top
SW28 "Graphite Contact" "Graphite Contact" 378.404,3.829 r0 top
SW29 "Graphite Contact" "Graphite Contact" 385.77,3.829 r0 top
SW30 "Graphite Contact" "Graphite Contact" 393.11,3.829 r0 top
SW31 "Graphite Contact" "Graphite Contact" 400.476,3.829 r0 top
SW32 "Graphite Contact" "Graphite Contact" 407.334,3.829 r0 top
SW33 "Graphite Contact" "Graphite Contact" 9.334,115.926 r0 top
SW34 "Graphite Contact" "Graphite Contact" 37.325,115.926 r0 top
SW35 "Graphite Contact" "Graphite Contact" 56.324,115.926 r0 top
SW36 "Graphite Contact" "Graphite Contact" 75.336,115.926 r0 top
SW37 "Graphite Contact" "Graphite Contact" 94.254,116.122 r0 top
SW38 "Graphite Contact" "Graphite Contact" 113.513,116.122 r0 top
SW39 "Graphite Contact" "Graphite Contact" 132.309,116.122 r0 top
SW40 "Graphite Contact" "Graphite Contact" 151.308,116.122 r0 top
SW41 "Graphite Contact" "Graphite Contact" 531.515,12.465 r0 top
SW42 "Graphite Contact" "Graphite Contact" 538.373,12.465 r0 top
SW43 "Graphite Contact" "Graphite Contact" 545.739,12.465 r0 top
SW44 "Graphite Contact" "Graphite Contact" 553.105,12.465 r0 top
SW45 "Graphite Contact" "Graphite Contact" 560.471,12.465 r0 top
SW46 "Graphite Contact" "Graphite Contact" 567.837,12.465 r0 top
SW47 "Graphite Contact" "Graphite Contact" 575.203,12.465 r0 top
SW48 "Graphite Contact" "Graphite Contact" 582.569,12.465 r0 top
SW49 "Graphite Contact" "Graphite Contact" 199.529,97.053 r0 top
SW50 "Graphite Contact" "Graphite Contact" 217.741,97.053 r0 top
SW51 "Graphite Contact" "Graphite Contact" 237.109,97.18 r0 top
SW52 "Graphite Contact" "Graphite Contact" 287.942,87.903 r0 top
SW53 "Graphite Contact" "Graphite Contact" 34.551,144.139 r0 top
SW54 "Graphite Contact" "Graphite Contact" 41.917,144.139 r0 top
SW55 "Graphite Contact" "Graphite Contact" 49.283,144.139 r0 top
SW56 "Graphite Contact" "Graphite Contact" 56.649,144.139 r0 top
SW57 "Graphite Contact" "Graphite Contact" 414.7,12.465 r0 top
SW58 "Graphite Contact" "Graphite Contact" 422.066,12.465 r0 top
SW59 "Graphite Contact" "Graphite Contact" 429.432,12.465 r0 top
SW60 "Graphite Contact" "Graphite Contact" 436.798,12.465 r0 top
SW61 "Graphite Contact" "Graphite Contact" 444.164,12.465 r0 top
SW62 "Graphite Contact" "Graphite Contact" 451.022,12.465 r0 top
SW63 "Graphite Contact" "Graphite Contact" 458.388,12.465 r0 top
SW64 "Graphite Contact" "Graphite Contact" 465.754,12.465 r0 top
SW65 "Graphite Contact" "Graphite Contact" 356.306,12.465 r0 top
SW66 "Graphite Contact" "Graphite Contact" 363.672,12.465 r0 top
SW67 "Graphite Contact" "Graphite Contact" 371.038,12.465 r0 top
SW68 "Graphite Contact" "Graphite Contact" 378.404,12.465 r0 top
SW69 "Graphite Contact" "Graphite Contact" 385.77,12.465 r0 top
SW70 "Graphite Contact" "Graphite Contact" 393.11,12.465 r0 top
SW71 "Graphite Contact" "Graphite Contact" 400.476,12.465 r0 top
SW72 "Graphite Contact" "Graphite Contact" 407.334,12.465 r0 top
SW73 "Graphite Contact" "Graphite Contact" 170.319,116.122 r0 top
SW74 "Graphite Contact" "Graphite Contact" 189.332,116.122 r0 top
SW75 "Graphite Contact" "Graphite Contact" 208.343,116.122 r0 top
SW76 "Graphite Contact" "Graphite Contact" 227.342,116.072 r0 top
SW77 "Graphite Contact" "Graphite Contact" 246.329,116.072 r0 top
SW78 "Graphite Contact" "Graphite Contact" 265.341,116.072 r0 top
SW79 "Graphite Contact" "Graphite Contact" 9.322,97.079 r0 top
SW80 "Graphite Contact" "Graphite Contact" 28.308,97.079 r0 top

## Footprints (in the part's own frame and the unit in brackets; to place one, negate y for a bottom-side part, rotate by r counter-clockwise, add the part's x,y. Pads: shape width x height; smd on the part's side, far side on the other; paste and mask are expansions set on the pad)
046288080000846+ [mm]
  rect 0.3x1.3 smd: 1(-19.75,2.825) 2(-19.25,2.825) 3(-18.75,2.825) 4(-18.25,2.825) 5(-17.75,2.825) 6(-17.25,2.825) 7(-16.75,2.825) 8(-16.25,2.825) 9(-15.75,2.825) 10(-15.25,2.825) 11(-14.75,2.825) 12(-14.25,2.825) 13(-13.75,2.825) 14(-13.25,2.825) 15(-12.75,2.825) 16(-12.25,2.825) 17(-11.75,2.825) 18(-11.25,2.825) 19(-10.75,2.825) 20(-10.25,2.825) 21(-9.75,2.825) 22(-9.25,2.825) 23(-8.75,2.825) 24(-8.25,2.825) 25(-7.75,2.825) 26(-7.25,2.825) 27(-6.75,2.825) 28(-6.25,2.825) 29(-5.75,2.825) 30(-5.25,2.825) 31(-4.75,2.825) 32(-4.25,2.825) 33(-3.75,2.825) 34(-3.25,2.825) 35(-2.75,2.825) 36(-2.25,2.825) 37(-1.75,2.825) 38(-1.25,2.825) 39(-0.75,2.825) 40(-0.25,2.825) 41(0.25,2.825) 42(0.75,2.825) 43(1.25,2.825) 44(1.75,2.825) 45(2.25,2.825) 46(2.75,2.825) 47(3.25,2.825) 48(3.75,2.825) 49(4.25,2.825) 50(4.75,2.825) 51(5.25,2.825) 52(5.75,2.825) 53(6.25,2.825) 54(6.75,2.825) 55(7.25,2.825) 56(7.75,2.825) 57(8.25,2.825) 58(8.75,2.825) 59(9.25,2.825) 60(9.75,2.825) 61(10.25,2.825) 62(10.75,2.825) 63(11.25,2.825) 64(11.75,2.825) 65(12.25,2.825) 66(12.75,2.825) 67(13.25,2.825) 68(13.75,2.825) 69(14.25,2.825) 70(14.75,2.825) 71(15.25,2.825) 72(15.75,2.825) 73(16.25,2.825) 74(16.75,2.825) 75(17.25,2.825) 76(17.75,2.825) 77(18.25,2.825) 78(18.75,2.825) 79(19.25,2.825) 80(19.75,2.825)
  rect 1.8x2.2 smd: MP1(-21.9,-2.825) MP2(21.9,-2.825)
  silkscreen extent -22.22,-4.11 22.23,3.84, body extent -22.1,-3.43 22.1,2.97, height 2.1
FH19C-6S-0.5SH(10) [mm] "Clamshell 0.5mm Bottom Contact Surface Mount 6 SMD,P=0.5mm FFC/FPC Connectors ROHS"
  rect 0.35x2.5 smd: 1(0,0) 2(0.5,0) 3(1,0) 4(1.5,0) 5(2,0) 6(2.5,0)
  silkscreen extent -1.24,-2.34 3.78,1.51, body extent -1.24,-2.38 3.76,1.11, height 0.9
FH34SRJ-26S-0.5SH(50) [mm] "CONN FFC FPC 26POS 0.50MM R/A"
  rect 0.3x0.8 smd: 1(6.25,1.25) 2(5.75,1.25) 3(5.25,1.25) 4(4.75,1.25) 5(4.25,1.25) 6(3.75,1.25) 7(3.25,1.25) 8(2.75,1.25) 9(2.25,1.25) 10(1.75,1.25) 11(1.25,1.25) 12(0.75,1.25) 13(0.25,1.25) 14(-0.25,1.25) 15(-0.75,1.25) 16(-1.25,1.25) 17(-1.75,1.25) 18(-2.25,1.25) 19(-2.75,1.25) 20(-3.25,1.25) 21(-3.75,1.25) 22(-4.25,1.25) 23(-4.75,1.25) 24(-5.25,1.25) 25(-5.75,1.25) 26(-6.25,1.25)
  rect 0.4x0.8 smd: MP1(-7.25,-1.25) MP2(7.25,-1.25)
  silkscreen extent -7.49,-1.91 7.49,1.94, body extent -7.5,-1.9 7.5,1.9, height 1
"Graphite Contact" [mm]
  rrect50% 1.85x4.2 smd: 1(0,0) 2(2.35,0)
  silkscreen extent -1.04,-2.21 3.39,2.21
"TEST POINT"#1 [mm]
  round 2.5 hole 1.5: 1(0,0)
  silkscreen extent -1.17,-1.17 1.17,1.16
"TEST POINT"#2 [mm]
  round 2.5 hole 1.5: 1(0,0.433)
  silkscreen extent -1.17,-1.17 1.17,1.16
X6511WVS-06H-C60D48R2 [mm] "250V 3A Brick nogging Square Pins 2.5mm 260? 6mm -40?~+105? 1 6 2.54mm Brass 1x6P SMD,P=2.54mm Pin Headers ROHS"
  rect 1.27x2.2 smd: 1(0,0) 2(2.54,-1.8) 3(5.08,0) 4(7.62,-1.8) 5(10.16,0) 6(12.7,-1.8)
  silkscreen extent -1.29,-1.8 13.97,1.45, body extent -1.24,-3.19 14,1.6

## Part data
J1 J2 J3 J5 J6 J7 J8 J9 J10 J11 J12 J13 J14 J15 J16 J17 J18 J19 J20 J21 J22 J23 J24 J25 J26 J27 J28 J29 J30 J31 J32 J33 J34 J35 J36 J37 J38 J39 J40 J41 J42 J43 J44 J48 J49 J50 J53 J54 J55 J58 J59 J60 J63 J64 J65 J68 J69 J70 J71 J72 J73 J74 J113 J114 J117 J118 J121 J122 J125 J126 J129 J130: "0.5mm Pitch, 0.9mm Height, No of Contact 4-50, FPC/FFC Connector, 0.5 A, -55 to 85 ℃, RoHS", Manufacturer=Hirose, Supplier Part Number 1=H125824CT-ND, Category="FFC / FPC", ComponentLink1Description=https://datasheet.ciiva.com/18563/ed-fh19cfh19sc-20140305-18563530.pdf?src-supplier=Digi-Key, ComponentLink1URL=https://datasheet.ciiva.com/18563/ed-fh19cfh19sc-20140305-18563530.pdf?src-supplier=Digi-Key, Manufacturer Part Number=FH19C-6S-0.5SH(10), Pricing 1="1=1.10000, 10=0.96900, 25=0.91200, 50=0.87400, 100=0.83600, 250=0.76000, 500=0.68400, 1000=0.60800, 2500=0.55100 (USD)", RoHS=Yes, Stock 1=1159, Supplier 1=Digi-Key
J4 J47: "0.5MM PITCH - 80 POS - RIGHT ANG", Manufacturer="Kyocera AVX", Package=Custom, ComponentLink1Description=LCSC, ComponentLink1URL=https://lcsc.com/product-detail/FFC-span-style-background-color-ff0-FPC-span-Connectors_Kyocera-046288080000846_C513346.html, Manufacturer Part No=046288080000846+
J45 J46 J51 J52 J56 J57 J61 J62 J66 J67 J76 J77 J78 J79 J80 J81 J82 J83 J84 J85 J86 J87 J88 J89 J90 J91 J92 J93 J94 J95 J96 J97 J98 J99 J100 J101 J102 J103 J104 J105 J106 J107 J108 J109 J110 J111 J112 J115 J116 J119 J120 J123 J124 J127 J128 J131 J132 J133 J134 J135 J136 J137 J138 J139 J140 J141 J142 J143 J144 J145 J146 J147: "6 POS 2.54mm SMD Header", Current Rating (Max)=3A, Manufacturer="XKB Connectivity", Voltage Rating (Max)=250V, Circluar Pins/Square Pins="Square Pins", ComponentLink1Description=LCSC, ComponentLink1URL=https://lcsc.com/product-detail/span-style-background-color-ff0-Pin-span-Headers_XKB-Connectivity-X6511WVS-06H-C60D48R2_C2883763.html, Insulation Height=2.5mm, Length of Mating Pin=6mm
J75: "CONN FFC FPC 26POS 0.50MM R/A", Manufacturer=Hirose, Manufacturer Part Number=FH34SRJ-8S-0.5SH(99), Supplier Part Number 1=1362475, Category="FFC / FPC", ComponentLink1Description=https://datasheet.ciiva.com/18561/ed-fh34s-20140305-18561974.pdf?src-supplier=Digi-Key, ComponentLink1URL=https://datasheet.ciiva.com/18561/ed-fh34s-20140305-18561974.pdf?src-supplier=Digi-Key, Pricing 1="5=2.79500, 25=2.28400, 100=2.17100, 250=1.96400 (USD)", RoHS=Yes, Stock 1=190, Supplier 1=RSComponents
P1 P2 P3 P4 P5 P6 P7 P8 P9 P10 P11 P12 P13 P14 P15 P16 P17 P18 P19 P20 P21: library part "TEST POINT", "Test Point ON"
SW1 SW2 SW3 SW4 SW5 SW6 SW7 SW8 SW9 SW10 SW11 SW12 SW13 SW14 SW15 SW16 SW17 SW18 SW19 SW20 SW21 SW22 SW23 SW24 SW25 SW26 SW27 SW28 SW29 SW30 SW31 SW32 SW33 SW34 SW35 SW36 SW37 SW38 SW39 SW40 SW41 SW42 SW43 SW44 SW45 SW46 SW47 SW48 SW49 SW50 SW51 SW52 SW53 SW54 SW55 SW56 SW57 SW58 SW59 SW60 SW61 SW62 SW63 SW64 SW65 SW66 SW67 SW68 SW69 SW70 SW71 SW72 SW73 SW74 SW75 SW76 SW77 SW78 SW79 SW80: "Push Button for Graphite Contact"

## Free pads (board coordinates)
  round 2.2 hole 2.2 unplated: MH(20.085,87.859) MH(47.925,106.859) MH(47.995,68.059) MH(57.995,30.459) MH(77.085,87.859) MH(95.995,49.059) MH(104.955,106.859) MH(133.995,30.859) MH(137.895,68.859) MH(152.995,49.059) MH(161.955,106.859) MH(172.085,87.859) MH(194.905,68.859) MH(229.085,49.059) MH(248.085,87.859) MH(251.905,68.859)
  round 2 hole 2 unplated: MH(218.955,106.859)
  round 3 hole 2.5: MH1(-5.853,96.942) MH2(-5.853,39.942) MH3(279.89,96.959) MH4(279.89,39.959)

## Via types
v1: diameter 0.4, hole 0.2, Top Layer to Bottom Layer, tented both sides, 724 vias
v2: diameter 0.4, hole 0.2, Top Layer to Bottom Layer, 3 vias
v3: diameter 0.6, hole 0.3, Top Layer to Bottom Layer, 1 vias

## Nets (pads, with @x,y where several pads share a name; then routed paths per layer and width w, separated by ;. In a path a pad name is that pad's centre, name@x,y a point inside that pad or via, vN(x,y) a via of type N, cw(c..) or ccw(c..) an arc to the next point about the centre after c; other vN are vias at no path point)
COl_1: J75.1 P1.1 SW1.2 SW9.2 SW17.2 SW25.2 SW33.2 | length 182.2
  Top Layer w0.203: v1(83.992,80.504) 86.988,77.508 v1(86.988,62.267)
  Bottom Layer w0.203: P1.1@-2.153,101.358 -0.676,99.881 77.875,99.881 79.925,97.831 79.925,84.572 v1(83.992,80.504) ; v1(86.988,62.267) 86.988,51.686 89.164,49.51 92.483,49.51 97.531,44.462 97.531,29.628 91.389,23.487 J75.1@91.389,10.908
Col_1.COL_2: J75.2 P2.1 SW2.2 SW10.2 SW18.2 SW26.2 SW34.2 | length 181.4
  Top Layer w0.203: v1(83.256,80.504) 86.488,77.272 v1(86.488,62.673)
  Bottom Layer w0.203: P2.1@-2.153,97.874 -0.676,99.351 77.465,99.351 79.395,97.421 79.395,84.365 v1(83.256,80.504) ; v1(86.488,62.673) 86.488,51.479 88.957,49.01 92.444,49.01 97.031,44.423 97.031,29.835 90.889,23.694 J75.2@90.889,10.908
Col_1.COL_3: J75.3 P3.1 SW3.2 SW11.2 SW19.2 SW27.2 SW35.2 | length 173.5
  Top Layer w0.203: v1(66.416,80.927) 82.02,80.927 85.988,76.959 v1(85.988,62.267)
  Bottom Layer w0.203: P3.1@-2.153,94.39 0.641,94.39 3.805,91.227 3.805,86.035 7.481,82.358 64.985,82.358 v1(66.416,80.927) ; v1(85.988,62.267) 85.988,51.271 88.75,48.51 92.405,48.51 96.531,44.384 96.531,30.042 90.389,23.901 J75.3@90.389,10.908
Col_1.COL_4: J75.4 P4.1 SW4.2 SW12.2 SW20.2 SW28.2 SW36.2 | length 170
  Top Layer w0.203: v1(65.933,80.427) 81.834,80.427 85.488,76.773 v1(85.488,62.673)
  Bottom Layer w0.203: P4.1@-2.153,90.907 0.641,90.907 3.232,88.316 3.232,85.725 7.005,81.952 64.408,81.952 v1(65.933,80.427) ; v1(85.488,62.673) 85.488,51.064 88.543,48.01 92.357,48.01 96.031,44.336 96.031,30.249 89.889,24.108 J75.4@89.889,10.908
Col_1.COL_5: J75.5 P5.1 SW5.2 SW13.2 SW21.2 SW29.2 SW37.2 | length 166.6
  Top Layer w0.203: v1@65.476,79.971 v1@65.494,79.953 ; v1@65.494,79.927 81.75,79.927 84.988,76.689 v1(84.988,62.267)
  Bottom Layer w0.203: P5.1@-2.153,87.423 0.641,87.423 6.544,81.52 63.901,81.52 v1(65.476,79.945) ; v1(84.988,62.267) 84.988,50.857 88.336,47.51 92.318,47.51 95.531,44.297 95.531,30.456 89.389,24.315 J75.5@89.389,10.908
Col_1.COL_6: J75.6 P6.1 SW6.2 SW14.2 SW22.2 SW30.2 SW38.2 | length 149.1
  Top Layer w0.203: v1(61.92,81.012) 63.495,81.012 68.473,76.034 68.473,52.336 71.8,49.008 v1(74.518,49.008)
  Bottom Layer w0.203: P6.1@-2.153,83.94 3.106,83.94 6.034,81.012 v1(61.92,81.012) ; v1(74.518,49.008) 74.518,44.487 80.507,38.498 80.507,30.849 88.889,22.467 J75.6@88.889,10.908
Col_1.COL_7: J75.7 P7.1 SW7.2 SW15.2 SW23.2 SW31.2 SW39.2 | length 146.8
  Top Layer w0.203: v1(61.513,80.53) 63.317,80.53 68.092,75.754 68.092,52.132 71.826,48.399 v1(74.036,48.399)
  Bottom Layer w0.203: P7.1@-2.153,80.456 61.301,80.456 61.337,80.492 61.476,80.492 v1(61.513,80.53) ; v1(74.036,48.399) 74.036,44.315 80.007,38.343 80.007,30.642 88.389,22.26 J75.7@88.389,10.908
Col_1.COL_8: J75.8 P8.1 SW8.2 SW16.2 SW24.2 SW32.2 SW40.2 | length 146.9
  Top Layer w0.203: v1(61.056,79.977) 62.076,79.977 62.147,80.047 63.114,80.047 67.711,75.45 67.711,51.904 71.953,47.662 v1(73.553,47.662)
  Bottom Layer w0.203: P8.1@-2.153,76.972 2.957,76.972 6.031,80.047 34.147,80.047 34.217,79.977 v1(61.056,79.977) ; v1(73.553,47.662) 73.553,44.131 79.507,38.177 79.507,30.435 87.889,22.053 J75.8@87.889,10.908
Col_2.COL_9: J75.9 P9.1 SW41.2 SW49.2 SW57.2 SW65.2 SW73.2 | length 138.3
  Top Layer w0.203: v1(38.072,47.024) 39.867,48.819 55.474,48.819 61.655,42.637 v1(74.193,42.637)
  Bottom Layer w0.203: P9.1@-2.153,73.489 4.267,73.489 5.608,72.148 5.608,54.317 11.145,48.78 36.317,48.78 v1(38.072,47.024) ; v1(74.193,42.637) 79.007,37.822 79.007,30.228 87.389,21.846 J75.9@87.389,10.908
Col_2.COL_10: J75.10 P10.1 SW42.2 SW50.2 SW58.2 SW66.2 SW74.2 | length 136.7
  Top Layer w0.203: v1(38.032,46.023) 37.994,46.061 37.994,46.424 37.593,46.825 37.593,47.414 39.466,49.288 55.604,49.288 61.75,43.141 v1(72.993,43.141)
  Bottom Layer w0.203: P10.1@-2.153,70.005 3.331,70.005 5.125,68.211 5.125,54.088 10.84,48.373 35.682,48.373 v1(38.032,46.023) ; v1(72.993,43.141) 78.507,37.626 78.507,30.021 86.889,21.639 J75.10@86.889,10.908
Col_2.COL_11: J75.11 P11.1 SW43.2 SW51.2 SW59.2 SW67.2 SW75.2 | length 134.4
  Top Layer w0.203: v1(37.536,45.376) 37.536,46.344 37.212,46.667 37.212,47.694 39.238,49.719 55.711,49.719 61.781,43.649 v1(71.8,43.649)
  Bottom Layer w0.203: P11.1@-2.153,66.522 3.691,66.522 4.567,65.646 4.567,54.037 10.612,47.992 34.92,47.992 v1(37.536,45.376) ; v1(71.8,43.649) 78.007,37.442 78.007,29.814 86.389,21.432 J75.11@86.389,10.908
Col_2.COL_12: J75.12 P12.1 SW44.2 SW52.2 SW60.2 SW68.2 SW76.2 | length 131.6
  Top Layer w0.203: v1(37.028,44.843) 37.028,46.313 36.831,46.51 36.831,47.999 39.034,50.202 55.767,50.202 61.837,44.131 v1(70.632,44.131)
  Bottom Layer w0.203: P12.1@-2.153,63.038 3.256,63.038 4.033,62.261 4.033,54.012 10.434,47.611 34.259,47.611 v1(37.028,44.843) ; v1(70.632,44.131) 77.507,37.256 77.507,29.607 85.889,21.225 J75.12@85.889,10.908
Col_2.COL_13: J75.13 P13.1 SW45.2 SW53.2 SW61.2 SW69.2 SW77.2 | length 120.9
  Top Layer w0.203: v1(37.536,44.233) v1(45.262,44.233)
  Bottom Layer w0.203: P13.1@-2.153,59.554 3.026,59.554 3.596,58.984 3.596,53.865 13.228,44.233 v1(37.536,44.233) ; v1@45.414,44.233 69.743,44.233 77.007,36.969 77.007,29.399 85.389,21.017 J75.13@85.389,10.908
Col_2.COL_14: J75.14 P14.1 SW46.2 SW54.2 SW62.2 SW70.2 SW78.2 | length 116.6
  Top Layer w0.203: v1(38.032,43.749) v1(44.826,43.749)
  Bottom Layer w0.203: P14.1@-2.153,56.071 0.641,56.071 12.962,43.75 13.787,43.75 ; 13.374,43.749 v1(38.032,43.749) ; v1(44.826,43.749) 57.597,43.749 59.965,41.381 59.965,33.45 61.633,31.782 61.773,31.642 74.126,31.642 84.889,20.879 J75.14@84.889,10.908
Col_2.COL_15: J75.15 P15.1 SW47.2 SW55.2 SW63.2 SW71.2 SW79.2 | length 114.2
  Top Layer w0.203: v1(37.536,43.249) v1(44.368,43.249)
  Bottom Layer w0.203: P15.1@-2.153,52.587 0.641,52.587 9.986,43.242 v1@37.536,43.242 ; v1(44.368,43.249) 57.487,43.249 59.465,41.271 59.465,33.243 61.454,31.254 73.808,31.254 84.389,20.672 J75.15@84.389,10.908
Col_2.COL_16: J75.16 P16.1 SW48.2 SW56.2 SW64.2 SW72.2 SW80.2 | length 113.5
  Top Layer w0.203: v1(38.032,42.749) v1(43.886,42.749)
  Bottom Layer w0.203: P16.1@-2.153,49.103 0.641,49.103 6.853,42.892 ; 8.123,42.749 6.996,42.749 ; v1(38.032,42.749) 6.996,42.749 ; v1(43.886,42.749) 57.302,42.749 58.965,41.085 58.965,33.036 61.128,30.873 73.482,30.873 83.889,20.465 J75.16@83.889,10.908 ; 6.853,42.892 6.996,42.749 ; 6.853,42.892 6.996,42.749